# Altium PCB AI_Watch_PCB.PcbDoc (part 1 of 3)
Units mm, origin at the board's own origin, x right, y up, seen from the top; angles counter-clockwise.
Board outline 25 x 31 mm, 4 copper layers (Top Layer, Ground, Power, Bottom Layer), stack 1.586 mm thick; 87 components, 63 nets, 302 pads, 164 vias.
Unrouted connection lines stored in the file: 13.
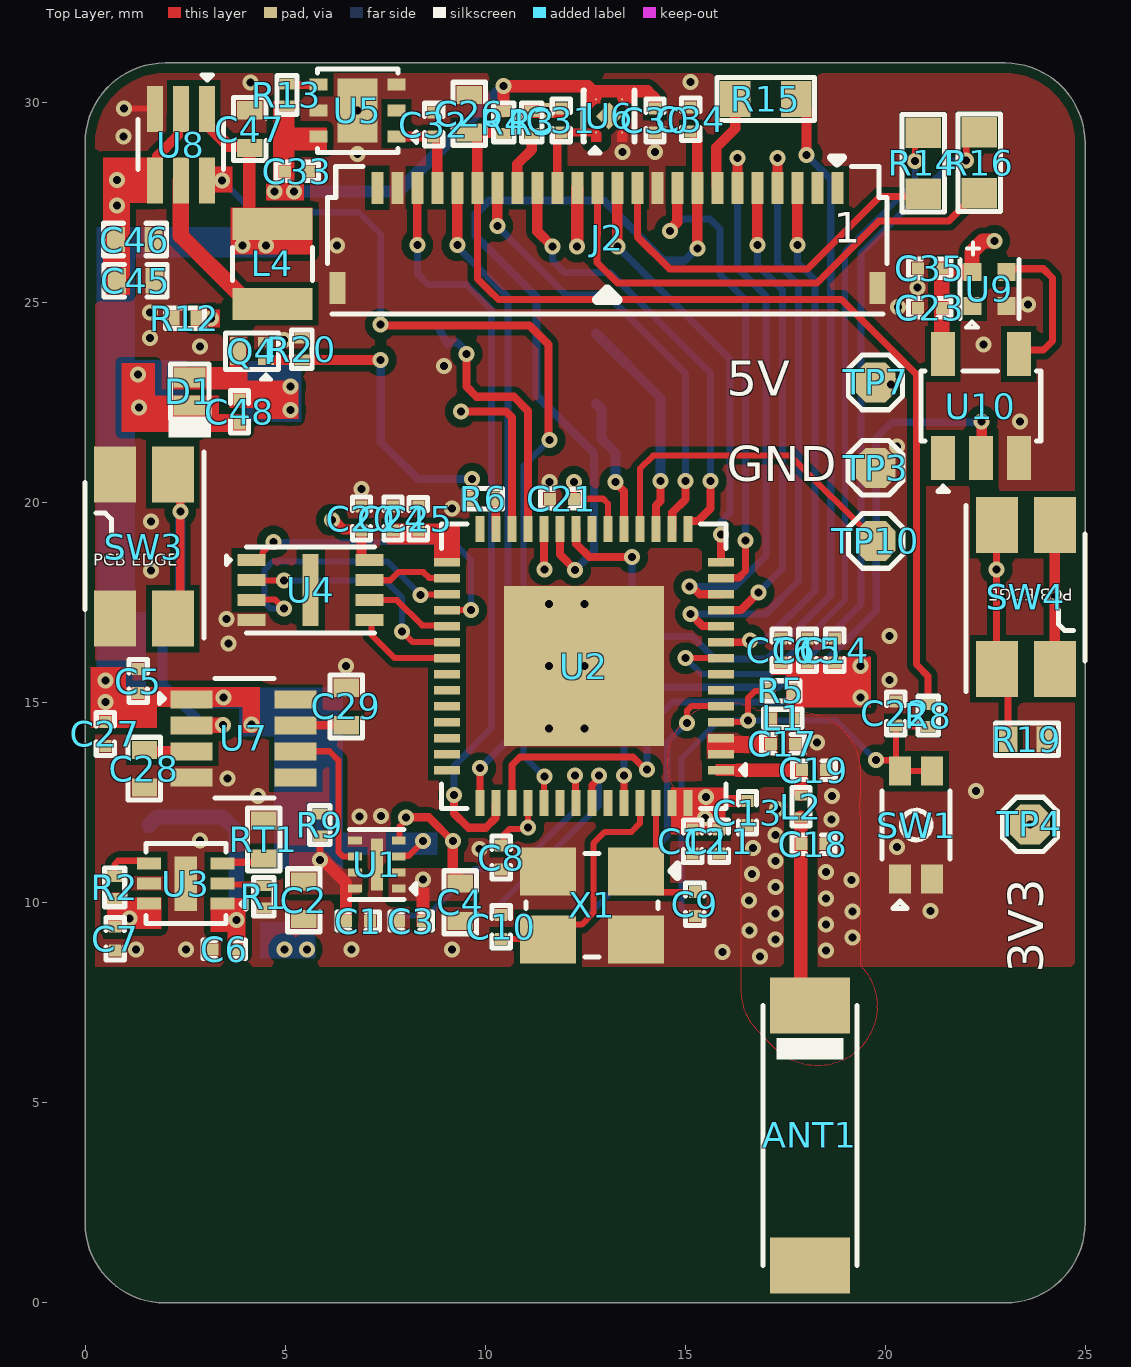
[diagram p0: Top Layer view]
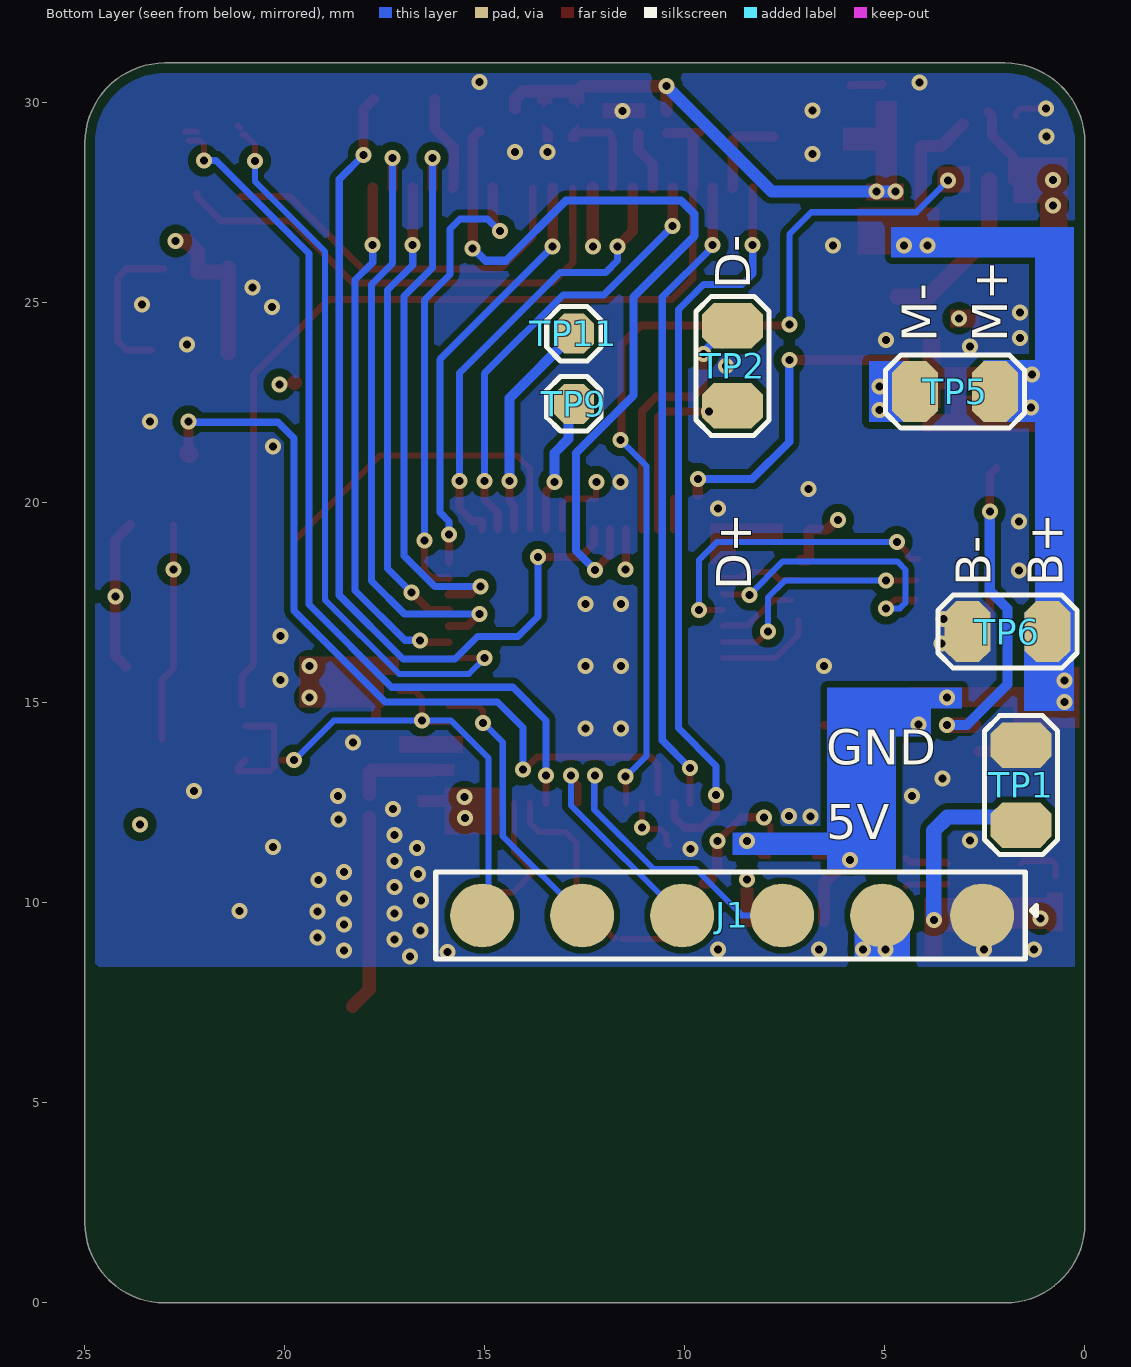
[diagram p1: Bottom Layer view, seen from below]
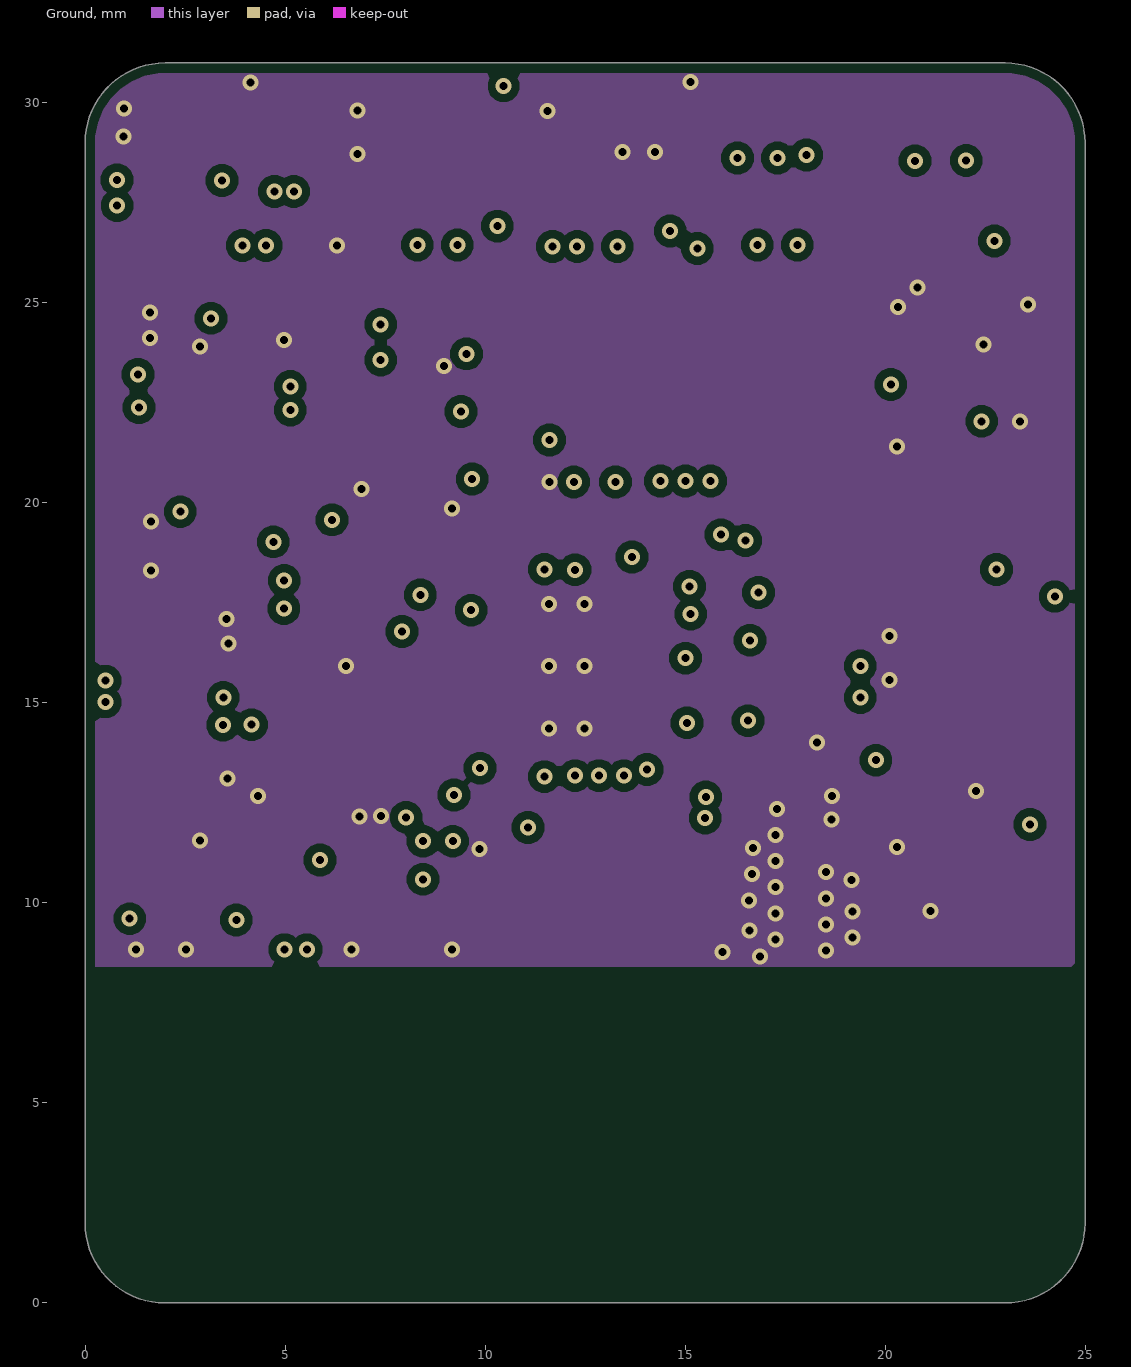
[diagram p2: Ground]
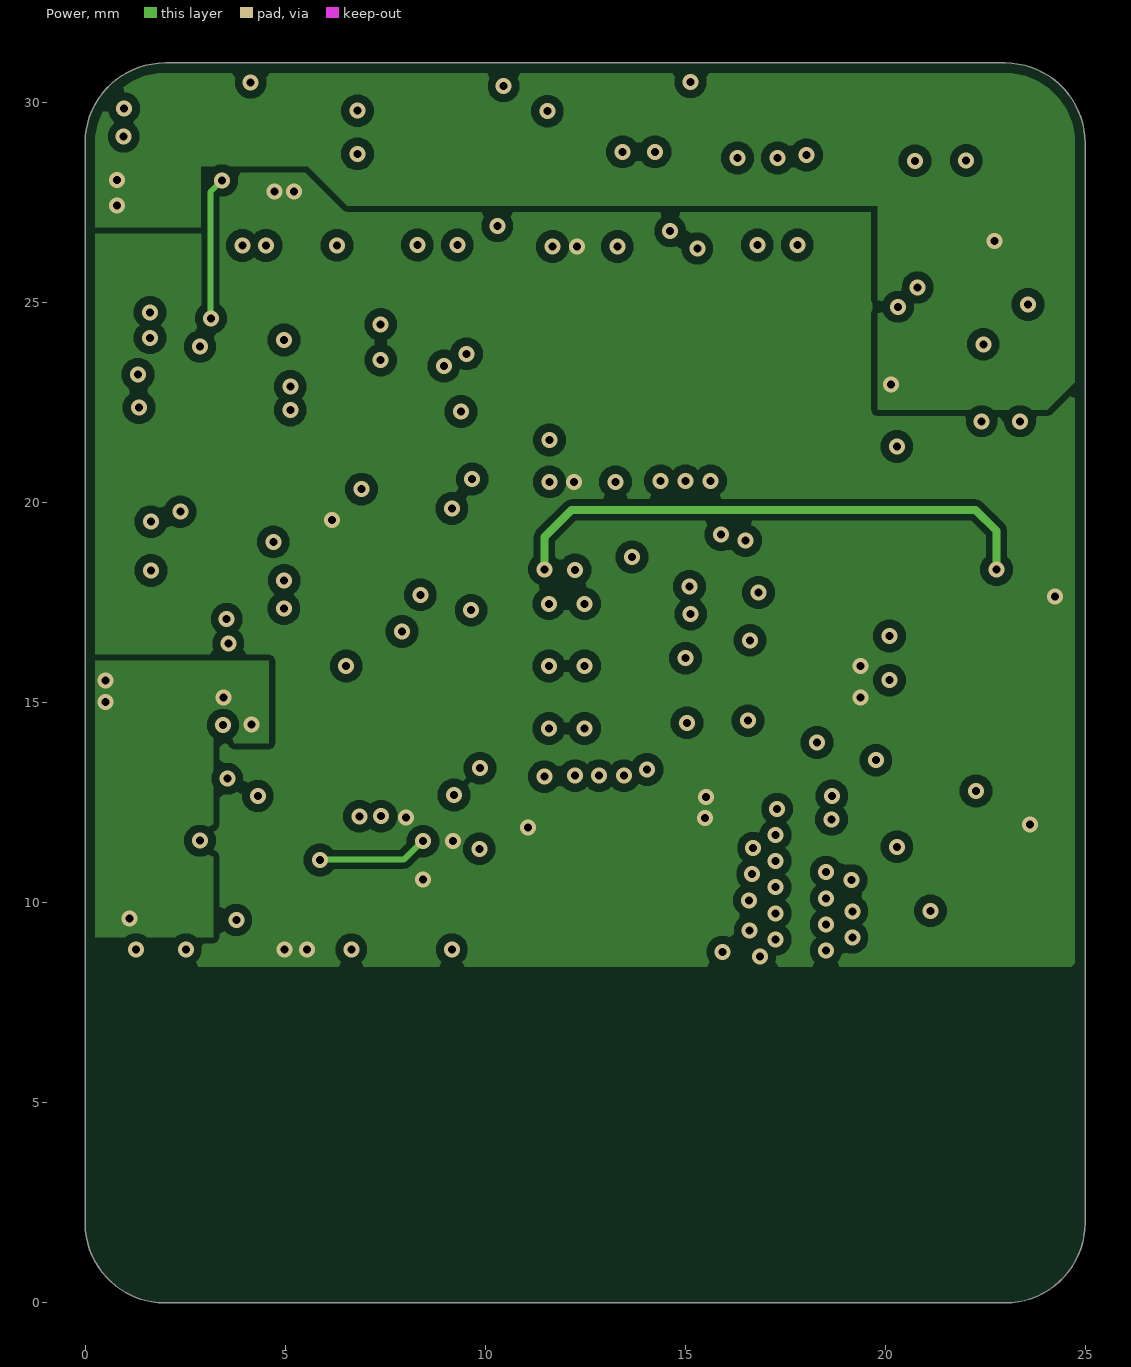
[diagram p3: Power]
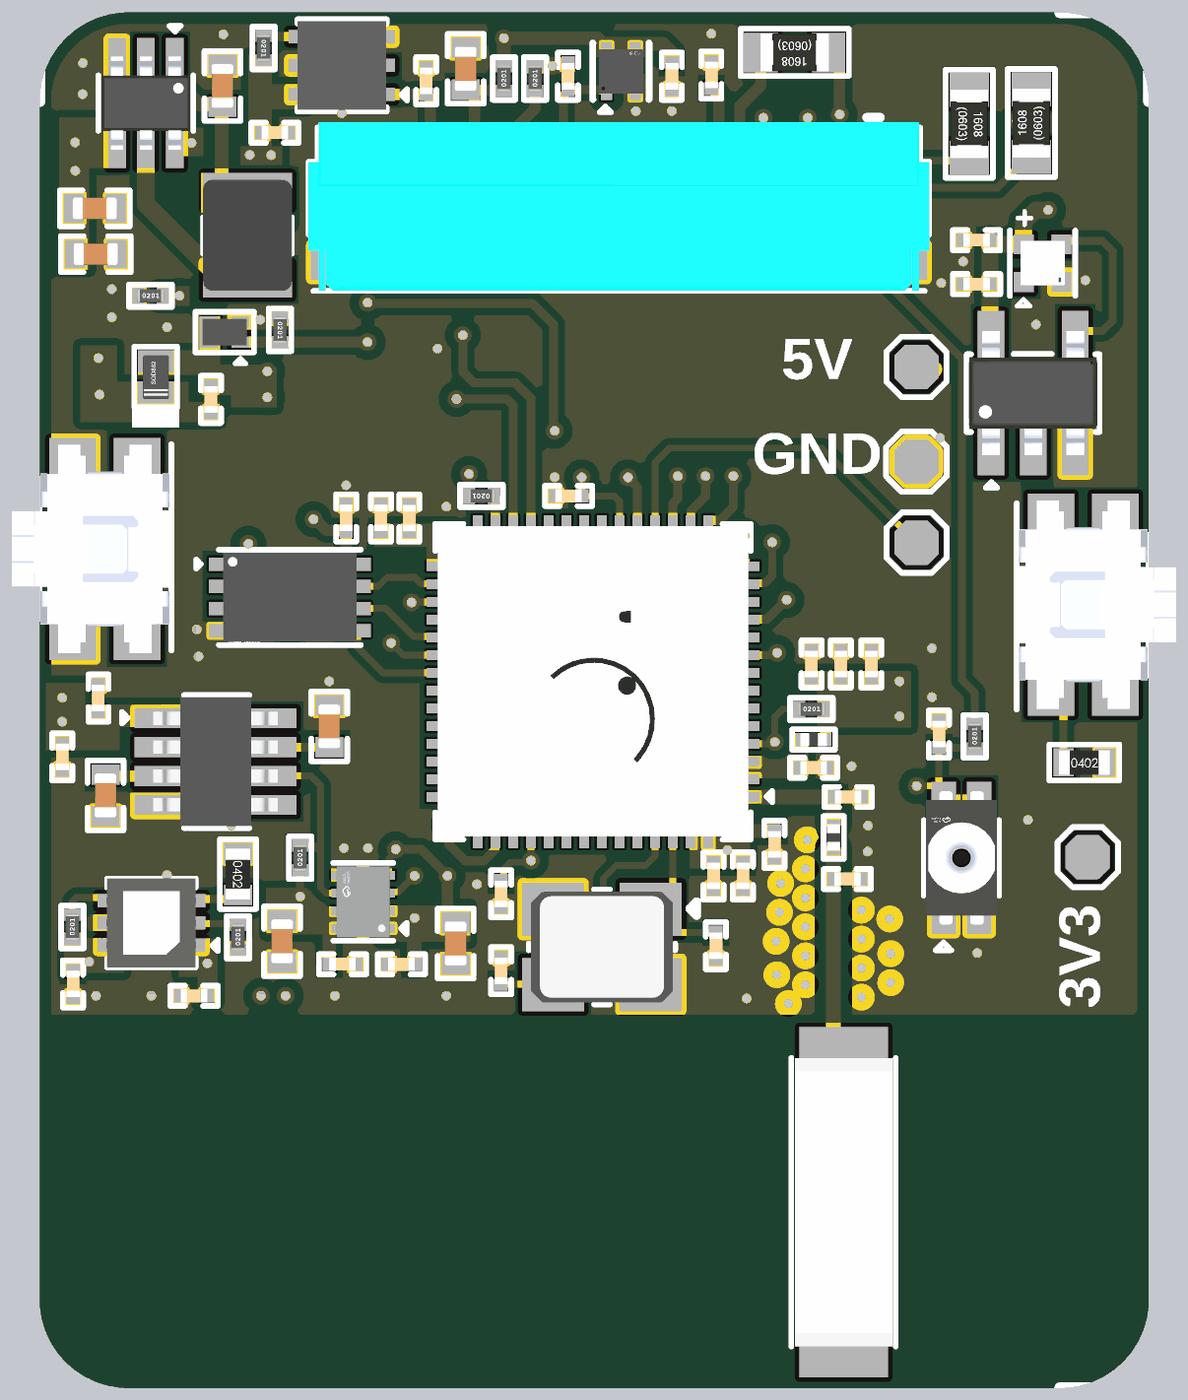
[diagram p5: 3D render of the assembled board from above, using the file's embedded part models]

## Layer stack, top to bottom
Top Solder: solder mask 0.0102, Solder Resist, Dk 3.8
Top Layer: signal copper 0.035
Dielectric 2: prepreg 0.2104, PP-006, Dk 4.4
Ground: signal copper 0.0152
Dielectric 1: core 1.065, FR-4, Dk 4.6
Power: signal copper 0.0152
Dielectric 3: prepreg 0.2104, PP-006, Dk 4.4
Bottom Layer: signal copper 0.035
Bottom Solder: solder mask 0.0102, Solder Resist, Dk 3.8

## Board outline
2,0 cw(c2,2) 0,2 0,29 cw(c2,29) 2,31 23,31 cw(c23,29) 25,29 25,2 cw(c23,2) 23,0

## Design rules (kind name [scope] priority, off if disabled: settings)
BoardOutlineClearance [All] p1: gap=0 ignorepadtopadclearanceinfootprint=FALSE except(0.254: Poly-OutlineEdge)
Clearance [All] p1: gap=0.254 ignorepadtopadclearanceinfootprint=TRUE except(0: Arc-Hole Track-Hole SMDPad-Hole THPad-Hole Via-Hole Fill-Hole Poly-Hole Region-Hole Text-Hole; 0.127: Arc-SMDPad Arc-Text Track-SMDPad SMDPad-SMDPad SMDPad-Fill Fill-Fill Text-Text; 0.152: Arc-Arc Arc-Track Arc-Poly Track-Track Track-Poly SMDPad-Poly Fill-Poly Poly-Poly; 0.178: Arc-Via Arc-Region Track-Via SMDPad-Via SMDPad-Region THPad-Via THPad-Poly Via-Via Via-Fill; 0.203: Via-Poly)
MinimumSolderMaskSliver [All] p1: minsoldermaskwidth=0.025
PolygonConnect [All] p1: thpad.connectstyle=Relief thpad.reliefconductorwidth=0.254 thpad.reliefentries=4 thpad.polygonreliefangle="90 Angle" thpad.airgapwidth=0.254 smdpad.connectstyle=Direct smdpad.reliefconductorwidth=0.254 smdpad.reliefentries=4 smdpad.polygonreliefangle="90 Angle" smdpad.airgapwidth=0.254 via.connectstyle=Direct via.reliefconductorwidth=0.254 via.reliefentries=4 via.polygonreliefangle="90 Angle" via.airgapwidth=0.254
RoutingVias [All] p1: holewidth=0.2 width=0.4 viastyle="Through Hole" minholewidth=0.2 minwidth=0.4 maxholewidth=0.2 maxwidth=0.4
SilkToSilkClearance [All] p1: silktosilkclearance=0
SilkToSolderMaskClearance [IsPad] p1: minsilkscreentomaskgap=0.003 clearancetoexposedcopper=TRUE
SolderMaskExpansion [All] p1: expansion=0.102 istentingtop=FALSE
Width RF [InNetClass('RF')] p1: maxlimit=0.33 minlimit=0.267 preferedwidth=0.33 toplayer_minwidth=0.33 bottomlayer_minwidth=0.33 impedanceprofiledriven=TRUE impedanceprofileid={CFCCCAA3-0583-4BB1-BB14-370E79FB1EA7} impedanceprofilevalue=50.000000 minimp=50.000000 maximp=50.000000 favimp=50.000000
Width [All] p2: maxlimit=0.762 minlimit=0.127 preferedwidth=0.254 minimp=50.000000 maximp=50.000000 favimp=50.000000
27 further rules are at their usual default settings.

## Classes and differential pairs
net class RF: LNA_IN NetANT1_1
component class Power_Sheet: C1 C2 C3 C4 C5 C6 C7 C27 C28 C29 C45 C46 C47 L4 R1 R2 R9 R12 RT1 SW3 TP1 TP6 U1 U3 U7 U8
component class Controller_Sheet: ANT1 C8 C9 C10 C11 C12 C13 C14 C15 C16 C17 C18 C19 C20 C21 C22 C23 C24 C25 C35 C48 D1 J1 L1 L2 Q4 R5 R6 R14 R15 R16 R19 R20 SW1 SW4 TP2 TP3 TP4 TP5 TP7 TP9 TP10 TP11 U2 U4 U9 U10 X1
component class Camera_Sheet: C26 C30 C31 C32 C33 C34 J2 R3 R4 R8 R13 U5 U6

## Components (designator, comment, footprint, x,y, rotation, side; value= is the part's Value field where it differs from the comment)
ANT1 "AN6520-245" AN6520-245 18.12,4.187 r270 top
C1 "2.2uF" CAP-0201 6.826,9.549 r180 top
C2 "10uF" Cap-0402 5.465,10.069 r90 top
C3 "2.2uF" CAP-0201 8.153,9.549 r0 top
C4 "10uF" Cap-0402 9.376,10.018 r90 top
C5 "0.1uF" CAP-0201 1.325,15.549 r270 top
C6 "1uF" CAP-0201 3.479,8.839 r0 top
C7 "2.2uF" CAP-0201 0.751,9.106 r90 top
C8 "0.1uF" CAP-0201 10.401,11.136 r90 top
C9 "10pF" CAP-0201 15.242,9.969 r90 top
C10 "10pF" CAP-0201 10.401,9.403 r90 top
C11 "2.2uF" CAP-0201 15.85,11.541 r90 top
C12 "0.1uF" CAP-0201 15.189,11.541 r90 top
C13 "10nF" CAP-0201 16.561,12.252 r90 top
C14 "2.2uF" CAP-0201 18.745,16.316 r270 top
C15 "2.2uF" CAP-0201 18.059,16.316 r270 top
C16 "0.1uF" CAP-0201 17.399,16.316 r270 top
C17 "0.1uF" CAP-0201 17.445,13.979 r180 top
C18 "2.7pF" CAP-0201 18.207,11.47 r180 top
C19 "4.7pF" CAP-0201 18.221,13.319 r180 top
C20 "0.1uF" CAP-0201 6.909,19.61 r270 top
C21 "0.1uF" CAP-0201 11.921,20.105 r0 top
C22 "0.1uF" CAP-0201 20.269,14.737 r90 top
C23 "2.2uF" CAP-0201 21.118,24.879 r0 top
C24 "0.1uF" CAP-0201 7.696,19.61 r270 top
C25 "1uF" CAP-0201 8.331,19.606 r90 top
C26 "15pF" Cap-0402 9.601,29.731 r270 top
C27 "2.2uF" CAP-0201 0.508,14.224 r90 top
C28 "680nF" Cap-0402 1.484,13.356 r90 top
C29 "680nF" Cap-0402 6.528,14.913 r270 top
C30 "0.1uF" CAP-0201 14.249,29.563 r90 top
C31 "0.1uF" CAP-0201 11.908,29.563 r270 top
C32 "0.1uF" CAP-0201 8.712,29.459 r270 top
C33 "0.1uF" CAP-0201 5.302,28.289 r180 top
C34 "15pF" Cap-0201 15.138,29.59 r90 top
C35 "0.1uF" CAP-0201 21.117,25.867 r180 top
C45 "4.7uF" Cap-0402 1.265,25.554 r180 top
C46 "4.7uF" Cap-0402 1.243,26.586 r0 top
C47 "10uF" Cap-0402 4.121,29.346 r270 top
C48 "0.1uF" CAP-0201 3.861,22.281 r270 top
D1 "LMBR4010BST5G" SOD-882 2.616,22.784 r270 top
J1 "POGO Connector 6 Pin" "POGO 6 Pin" 7.569,9.687 r0 bottom
J2 "FH34SRJ-24S-0.5SH(50)" FH34SRJ-24S-0.5SH(50) 13.056,26.629 r0 top
L1 "2.2nH" IND-0201 17.445,14.614 r180 top
L2 "1.6nH" IND-0201 17.897,12.406 r90 top
L4 "4.7uH" SLO252012F4R7MTT 4.684,25.979 r270 top
Q4 "RV2C010UNT2L" DFN1006-3 4.171,23.796 r90 top
R1 "4.7K" Res-0201 4.47,10.156 r90 top
R2 "10K" Res-0201 0.737,10.389 r90 top
R3 "10K" Res-0201 11.167,29.512 r90 top
R4 "0R" Res-0201 10.464,29.512 r90 top
R5 "10K" Res-0201 17.394,15.3 r0 top
R6 "100R" Res-0201 9.957,20.105 r180 top
R8 "0R" Res-0201 21.076,14.686 r90 top
R9 "10K" Res-0201 5.871,11.95 r90 top
R12 "10K" Res-0201 2.497,24.617 r0 top
R13 "10K" Res-0201 5.048,30.2 r270 top
R14 "0R" Res-0603 20.952,28.492 r90 top
R15 "0R" Res-0603 17.018,30.098 r0 top
R16 "0R" Res-0603 22.352,28.507 r270 top
R19 "10K" Res-0402 23.546,14.097 r0 top
R20 "10K" Res-0201 5.416,23.846 r270 top
RT1 "10K" Res-0402 4.47,11.582 r270 top value=10kR
SW1 "SKTAAAE010" SKTAAAE010 20.777,11.947 r90 top
SW3 "EVQ-P7A01P" EVQP7A01P 1.47,18.907 r270 top
SW4 "EVQ-P7A01P" EVQP7A01P 23.52,17.653 r90 top
TP1 "2 Test Pad" "2 Test Pad" 1.597,13.945 r270 bottom
TP2 "2 Test Pad" "2 Test Pad" 8.81,22.428 r90 bottom
TP3 "TEST POINT 0.5mm Dia" "Test-point - 0.5mm" 19.761,20.879 r0 top
TP4 "TEST POINT 0.5mm Dia" "Test-point - 0.5mm" 23.622,11.963 r0 top
TP5 "2 Test Pad" "2 Test Pad" 4.247,22.785 r180 bottom
TP6 "2 Test Pad" "2 Test Pad" 2.937,16.783 r180 bottom
TP7 "TEST POINT 0.5mm Dia" "Test-point - 0.5mm" 19.761,23.012 r90 top
TP9 "TEST POINT 0.5mm Dia" "Test-point - 0.5mm" 12.776,22.479 r90 bottom
TP10 "TEST POINT 0.5mm Dia" "Test-point - 0.5mm" 19.766,19.05 r90 top
TP11 "TEST POINT 0.5mm Dia" "Test-point - 0.5mm" 12.776,24.232 r90 bottom
U1 "LD56100DPU33R" DFN-8(1.2x1.6) 7.293,10.958 r180 top
U2 "ESP32-S3R8" "56-QFN (7x7)" 12.471,15.919 r180 top
U3 "FAN54120MP420X" DFN-6-EP(2x2) 2.518,10.482 r180 top
U4 "GD25Q16EEIGR" USON-8(2x3) 5.639,17.819 r0 top
U5 "TPS78228DRVR" "6-WSON (2x2)" 6.809,29.806 r180 top
U6 "XC6504A1219R-G" USPQ-4B04(1x1) 13.101,29.676 r90 top
U7 "LTC2950CTS8-2#TRPBF" TSOT-23-8 3.964,14.118 r0 top
U8 "TPS61222DCKR" SC-70-6 2.393,28.957 r270 top
U9 "XL-1010RGBC-WS2812B" XL-1010RGBC-WS2812B 22.606,25.349 r90 top
U10 "SN74LV1T34DBVR" SOT-23-5 22.393,22.424 r90 top
X1 "40MHz" X322540MPB4SI_ 12.675,9.941 r180 top value=40MHZ

## Footprints (in the part's own frame and the unit in brackets; to place one, negate y for a bottom-side part, rotate by r counter-clockwise, add the part's x,y. Pads: shape width x height; smd on the part's side, far side on the other; paste and mask are expansions set on the pad)
"2 Test Pad" [mil]
  oct 45x60 smd: 1(0,0) 2(78.74,0)
  silkscreen extent -29,-36 108,36
"6-WSON (2x2)" [mm] "TPS60150DRVR"
  rect 0.45x0.3 smd: 1(-0.975,0.65) 2(-0.975,0) 3(-0.975,-0.65) 4(0.975,-0.65) 5(0.975,0) 6(0.975,0.65)
  rect 1x1.6 smd: 7(0,0)
  silkscreen extent -1.47,-1.04 1,1.04, body extent -1,-1 1,1, height 0.78
"56-QFN (7x7)" [mm]
  rect 0.65x0.22 smd mask+0.055: 1(-3.425,2.6) 2(-3.425,2.2) 3(-3.425,1.8) 4(-3.425,1.4) 5(-3.425,1) 6(-3.425,0.6) 7(-3.425,0.2) 8(-3.425,-0.2) 9(-3.425,-0.6) 10(-3.425,-1) 11(-3.425,-1.4) 12(-3.425,-1.8) 13(-3.425,-2.2) 14(-3.425,-2.6) 29(3.425,-2.6) 30(3.425,-2.2) 31(3.425,-1.8) 32(3.425,-1.4) 33(3.425,-1) 34(3.425,-0.6) 35(3.425,-0.2) 36(3.425,0.2) 37(3.425,0.6) 38(3.425,1) 39(3.425,1.4) 40(3.425,1.8) 41(3.425,2.2) 42(3.425,2.6)
  rect 0.22x0.65 smd mask+0.055: 15(-2.6,-3.425) 16(-2.2,-3.425) 17(-1.8,-3.425) 18(-1.4,-3.425) 19(-1,-3.425) 20(-0.6,-3.425) 21(-0.2,-3.425) 22(0.2,-3.425) 23(0.6,-3.425) 24(1,-3.425) 25(1.4,-3.425) 26(1.8,-3.425) 27(2.2,-3.425) 28(2.6,-3.425) 43(2.6,3.425) 44(2.2,3.425) 45(1.8,3.425) 46(1.4,3.425) 47(1,3.425) 48(0.6,3.425) 49(0.2,3.425) 50(-0.2,3.425) 51(-0.6,3.425) 52(-1,3.425) 53(-1.4,3.425) 54(-1.8,3.425) 55(-2.2,3.425) 56(-2.6,3.425)
  rect 4x4 smd mask+0.055: 57(0,0)
  silkscreen extent -4.04,-3.56 3.56,3.56, body extent -3.5,-3.51 3.5,3.49, height 0.92
AN6520-245 [mm]
  rect 1.4x2 smd: 1(-3.25,0) 2(3.25,0)
  silkscreen extent -3.25,-1.18 3.25,1.18, body extent -3.25,-1.1 3.25,1.1, height 1
CAP-0201 [mm]
  rect 0.3x0.3 smd mask+0.055: 1(-0.3,0) 2(0.3,0)
  silkscreen extent -0.53,-0.23 0.53,0.23, body extent -0.3,-0.15 0.3,0.15, height 0.28
Cap-0201 [mm]
  rect 0.3x0.3 smd mask+0.055: 1(-0.3,0) 2(0.3,0)
  silkscreen extent -0.53,-0.23 0.53,0.23, body extent -0.3,-0.15 0.3,0.15, height 0.28
Cap-0402 [mil]
  rect 18x25 smd mask+2.36: 1(-18.5,0) 2(18.5,0)
  silkscreen extent -31,-16 31,16, body extent -20,-10 20,10, height 19
DFN1006-3 [mm]
  rect 0.25x0.4 smd: 1(-0.225,-0.35) 2(0.225,-0.35)
  rect 0.7x0.4 smd: 3(0,0.35)
  silkscreen extent -0.71,-0.66 0.46,0.66, body extent -0.3,-0.5 0.3,0.5, height 0.53
DFN-6-EP(2x2) [mm]
  rect 0.6x0.3 smd: 1(-0.917,0.5) 2(-0.917,0) 3(-0.917,-0.5) 4(0.918,-0.5) 5(0.918,0) 6(0.918,0.5)
  rect 0.56x1.37 smd: 7(0,0)
  silkscreen extent -1.5,-1 1,1, body extent -1.01,-1 1.01,1, height 0.76
DFN-8(1.2x1.6) [mm]
  rect 0.345x0.2 smd paste+0 mask+0.051: 1(-0.547,0.6) 2(-0.547,0.2) 3(-0.547,-0.2) 4(-0.547,-0.6) 5(0.547,-0.6) 6(0.547,-0.2) 7(0.547,0.2) 8(0.547,0.6)
  rect 0.3x1.3 smd paste+0 mask+0.051: 9(0,0)
  silkscreen extent -0.98,-0.88 0.68,0.88, body extent -0.61,-0.81 0.61,0.81, height 0.4
EVQP7A01P [mm]
  rect 1.4x1.05 smd: 1(-1.8,0.725) 1(1.8,0.725) 2(-1.8,-0.725) 2(1.8,-0.725)
  silkscreen extent -2.36,-1.47 2.29,1.5, body extent -2.35,-2.1 2.35,1.45, height 1.35
FH34SRJ-24S-0.5SH(50) [mm]
  rect 0.3x0.8 smd: 1(5.75,1.25) 2(5.25,1.25) 3(4.75,1.25) 4(4.25,1.25) 5(3.75,1.25) 6(3.25,1.25) 7(2.75,1.25) 8(2.25,1.25) 9(1.75,1.25) 10(1.25,1.25) 11(0.75,1.25) 12(0.25,1.25) 13(-0.25,1.25) 14(-0.75,1.25) 15(-1.25,1.25) 16(-1.75,1.25) 17(-2.25,1.25) 18(-2.75,1.25) 19(-3.25,1.25) 20(-3.75,1.25) 21(-4.25,1.25) 22(-4.75,1.25) 23(-5.25,1.25) 24(-5.75,1.25)
  rect 0.4x0.8 smd: MP1(-6.75,-1.25) MP2(6.75,-1.25)
  silkscreen extent -6.99,-1.91 6.99,2.01, body extent -7,-1.9 7,1.9, height 1
IND-0201 [mm]
  rect 0.25x0.3 smd mask+0.055: 1(-0.275,0) 2(0.275,0)
  silkscreen extent -0.48,-0.23 0.48,0.23, body extent -0.3,-0.15 0.3,0.15, height 0.15
"POGO 6 Pin" [mm]
  round 1.6 smd: 1(-5,0) 2(-2.5,0) 3(0,0) 4(2.5,0) 5(5,0) 6(7.5,0)
  silkscreen extent -6.36,-1.09 8.66,1.09
Res-0201 [mm]
  rect 0.27x0.37 smd mask+0.055: 1(-0.275,0) 2(0.275,0)
  silkscreen extent -0.48,-0.25 0.48,0.25, body extent -0.3,-0.15 0.3,0.15, height 0.29
Res-0402 [mil]
  rect 18x25 smd mask+2.17: 1(-18.5,0) 2(18.5,0)
  silkscreen extent -32,-17 32,16, body extent -23,-11 23,11, height 16
Res-0603 [mil]
  rect 30x35 smd: 1(-30,0) 2(30,0)
  silkscreen extent -48,-21 48,21, body extent -31,-17 31,17, height 18
SC-70-6 [mm]
  rect 1.15x0.4 smd: 1(-0.89,0.65) 2(-0.89,0) 3(-0.89,-0.65) 4(0.89,-0.65) 5(0.89,0) 6(0.89,0.65)
  silkscreen extent -1.74,-1.07 0.63,1.07, body extent -1.05,-1 1.05,1, height 1.1
SKTAAAE010 [mm]
  rect 0.72x0.55 smd: 1(-1.35,0.4) 2(1.35,0.4) 3(-1.35,-0.4) 4(1.35,-0.4)
  silkscreen extent -2.08,-0.85 0.85,0.85, body extent -1.5,-0.8 1.5,0.8, height 0.54
SLO252012F4R7MTT [mm]
  rect 0.8x2 smd: 1(-1,0) 2(1,0)
  silkscreen extent -0.41,-1 0.42,1, body extent -1.25,-1 1.25,1, height 1.2
SOD-882 [mm]
  rect 0.5x0.8 smd mask+0.055: 1(-0.35,0) 2(0.35,0)
  silkscreen extent -0.69,-0.53 1.14,0.53, body extent -0.49,-0.29 0.49,0.29, height 0.48
SOT-23-5 [mm]
  rect 1.1x0.6 smd: 1(-1.3,0.95) 2(-1.3,0) 3(-1.3,-0.95) 4(1.3,-0.95) 5(1.3,0.95)
  silkscreen extent -2.13,-1.5 0.88,1.5, body extent -1.4,-1.45 1.4,1.45, height 1.45
"Test-point - 0.5mm" [mm]
  oct 1x1 smd: 1(0,0)
  silkscreen extent -0.68,-0.68 0.68,0.68
TSOT-23-8 [mm]
  rect 1.05x0.45 smd: 1(-1.3,0.975) 2(-1.3,0.325) 3(-1.3,-0.325) 4(-1.3,-0.975) 5(1.3,-0.975) 6(1.3,-0.325) 7(1.3,0.325) 8(1.3,0.975)
  silkscreen extent -2.11,-1.5 0.76,1.5, body extent -1.4,-1.45 1.4,1.45, height 1
USON-8(2x3) [mm]
  rect 0.7x0.3 smd mask+0.055: 1(-1.473,0.75) 2(-1.473,0.25) 3(-1.473,-0.25) 4(-1.473,-0.75) 5(1.473,-0.75) 6(1.473,-0.25) 7(1.473,0.25) 8(1.473,0.75)
  rect 0.4x1.8 smd: 9(0,0)
  silkscreen extent -2.11,-1.07 1.6,1.07, body extent -1.5,-1 1.5,1, height 0.47
USPQ-4B04(1x1) [mm]
  round 0.05 smd: 1(-0.415,0.325) 2(-0.415,-0.325) 3(0.415,-0.325) 4(0.415,0.325)
  rect 0.48x0.47 smd rot 135: 5(0,0)
  Top Layer region: 0.415,0.2 0.18,0.45 0.65,0.45 0.65,0.2 0.415,0.2
  Top Layer region: -0.415,-0.2 -0.18,-0.45 -0.65,-0.45 -0.65,-0.2 -0.415,-0.2
  Top Layer region: 0.18,-0.45 0.415,-0.2 0.65,-0.2 0.65,-0.45 0.18,-0.45
  Top Layer region: -0.18,0.45 -0.415,0.2 -0.65,0.2 -0.65,0.45 -0.18,0.45
  silkscreen extent -0.92,-0.64 0.64,0.64, body extent -0.51,-0.5 0.51,0.5, height 0.61
X322540MPB4SI_ [mm]
  rect 1.4x1.2 smd: 1(-1.1,-0.85) 2(1.1,-0.85) 3(1.1,0.85) 4(-1.1,0.85)
  silkscreen extent -2.13,-1.3 1.65,1.3, body extent -1.6,-1.25 1.6,1.25, height 0.8
XL-1010RGBC-WS2812B [mm]
  rect 0.45x0.45 smd: 1(-0.425,0.425) 2(0.425,0.425) 3(-0.425,-0.425) 4(0.425,-0.425)
  silkscreen extent -0.97,-0.74 1.17,0.74, body extent -0.5,-0.5 0.5,0.5, height 0.81

## Part data
ANT1: "SMD Antennas ROHS", LCSC Part Number=C239238, Manufacturer="Rainsun microwave Tech", ComponentLink1Description=LCSC, ComponentLink1URL=https://www.lcsc.com/product-detail/Antennas_Rainsun-microwave-Tech-AN6520-245_C239238.html, Manufacturer Part Number=AN6520-245
C1 C3 C7 C11 C14 C15 C23 C27: library part CC0201MRX5R6BB225, "CAP CER 2.2UF 10V X5R 0201", Case/Package=0201, LCSC Part Number=C2186869, Manufacturer=Yageo, Max Operating Temperature=85°C, Min Operating Temperature=-55°C, Supplier Part Number=603-CC0201MRX56BB225, Tolerance=20%, Voltage Rating=10V, Category="Ceramic Capacitors", ComponentLink1Description=https://www.yageo.com/upload/media/product/productsearch/datasheet/mlcc/UPY-GPHC_X5R_4V-to-50V_26.pdf?src-supplier=Digi-Key, ComponentLink1URL=https://www.yageo.com/upload/media/product/productsearch/datasheet/mlcc/UPY-GPHC_X5R_4V-to-50V_26.pdf?src-supplier=Digi-Key, Item Type=Capacitor, Manufacturer Part Number=CC0201MRX5R6BB225, Mounting Technology="Surface Mount", Packaging="Tape and Reel", Pricing="1=0.43, 10=0.294, 50=0.294, 100=0.176, 1000=0.112, 10000=0.091 (USD)", RoHS=Yes, RoHS Compliant=Yes, Series=CC, Stock=25553, Supplier=Mouser
C2 C4 C47: library part CC0402MRX5R6BB106, "CAP CER 10UF 10V X5R 0402", Case Code (Imperial)=0402, Case Code (Metric)=1005, LCSC Part Number=C962143, Manufacturer=Yageo, Max Operating Temperature=85°C, Min Operating Temperature=-55°C, Supplier Part Number 1=6097631, Tolerance=20%, Voltage Rating=10V, Capacitance=10uF, Case/Package=0402, Category="Ceramic Capacitors", ComponentLink1Description=http://www.yageo.com/documents/recent/UPY-GPHC_X5R_4V-to-50V_25.pdf?src-supplier=Digi-Key, ComponentLink1URL=http://www.yageo.com/documents/recent/UPY-GPHC_X5R_4V-to-50V_25.pdf?src-supplier=Digi-Key, Item Type=Capacitor, Manufacturer Part Number=CC0402MRX5R6BB106, Mount="Surface Mount", Packaging="Tape and Reel", Pricing 1="10000=0.02650, 20000=0.02590, 30000=0.02550, 40000=0.02530, 50000=0.02450 (USD)", RoHS=Yes, RoHS Compliant=Yes, Stock 1=80000, Supplier 1="Future Electronics"
C5 C8 C12 C16 C17 C20 C21 C22 C24 C30 C31 C32 C33 C35 C48: library part GRM033C81E104KE14D, "CAP CER 0.1UF 25V X6S 0201", Capacitance=100nF, Case Code (Imperial)=0201, Case Code (Metric)=0603, Dielectric=X6S, Manufacturer=Murata, Max Operating Temperature=105°C, Min Operating Temperature=-55°C, Package Quantity=15000, Supplier Part Number 1=490-10403-1-ND, Tolerance=10%, Voltage Rating=25V, Case/Package=0201, Category="Ceramic Capacitors", ComponentLink1Description=http://www.mouser.com/ds/2/281/c02e-2905.pdf?src-supplier=Mouser, ComponentLink1URL=http://www.mouser.com/ds/2/281/c02e-2905.pdf?src-supplier=Mouser, ComponentLink2Description=http://www.farnell.com/datasheets/2722733.pdf?src-supplier=Farnell, ComponentLink2URL=http://www.farnell.com/datasheets/2722733.pdf?src-supplier=Farnell, ComponentLink3Description=http://search.murata.co.jp/Ceramy/image/img/A01X/G101/ENG/GRM033C81E104KE14-01.pdf?src-supplier=Digi-Key, ComponentLink3URL=http://search.murata.co.jp/Ceramy/image/img/A01X/G101/ENG/GRM033C81E104KE14-01.pdf?src-supplier=Digi-Key, Height=0.3mm, Length=0.024inch, Manufacturer Part Number=GRM033C81E104KE14D, Mount="Surface Mount", Packaging="Tape and Reel", Pricing 1="1=0.10000, 10=0.05100, 50=0.02780, 100=0.02260, 500=0.01616, 1000=0.01270, 2500=0.01155, 5000=0.01063 (USD)", RoHS=Yes, RoHS Compliant=Yes, Stock 1=91, Supplier 1=Digi-Key, Termination=SMD/SMT, Thickness=0.013inch, Voltage Rating (DC)=25V, Weight=1.2E-05oz, Width=0.3mm
C6 C25: library part CC0201MRX5R7BB105, "CAP CER 1UF 16V X5R 0201", LCSC Part Number=C5182464, Manufacturer=Yageo, Supplier Part Number=13-CC0201MRX5R7BB105TR-ND, Category="Ceramic Capacitors", Item Type=Capacitor, Manufacturer Part Number=CC0201MRX5R7BB105, RoHS=Yes, Supplier=Digi-Key
C9 C10: library part CGA1A2C0G1E100D030BA, "CAP CER 10PF 25V C0G 0201", Case Code (Imperial)=0201, Case Code (Metric)=0603, Dielectric=C0G, LCSC Part Number=C2168728, Manufacturer=TDK, Max Operating Temperature=125°C, Min Operating Temperature=-55°C, Package Quantity=1, Ratings=AEC-Q200, Resistor Type=Ceramic, Supplier Part Number 1=445-9023-1-ND, Voltage Rating=25V, Capacitance=10pF, Case/Package=0201, Category="Ceramic Capacitors", ComponentLink1Description=https://datasheet.ciiva.com/24220/cga1a2c0g1e100d030ba-271838-24220873.pdf?src-supplier=Mouser, ComponentLink1URL=https://datasheet.ciiva.com/24220/cga1a2c0g1e100d030ba-271838-24220873.pdf?src-supplier=Mouser, Depth=0.3mm, Height=0.3mm, Item Type=Capacitor, Length=0.6mm, Manufacturer Part Number=CGA1A2C0G1E100D030BA, Mount="Surface Mount", Packaging="Tape and Reel", Pricing 1="1=0.11000, 10=0.07900, 50=0.04340, 100=0.03540, 500=0.02530, 1000=0.01987, 2500=0.01807, 5000=0.01662 (USD)", RoHS=Yes, RoHS Compliant=Yes, Series=CGA, Stock 1=28695, Supplier 1=Digi-Key, Termination=SMD/SMT, Thickness=0.013inch, Voltage Rating (DC)=25V, Weight=6E-06oz, Width=0.3mm
C13: library part GRM033R71E103KE14D, "CAP CER 10000PF 25V X7R 0201", Case/Package=0201, Dielectric=X7R, LCSC Part Number=C85930, Manufacturer=Murata, Max Operating Temperature=125°C, Min Operating Temperature=-55°C, Tolerance=10%, Voltage Rating=25V, Capacitance=10nF, Category="Ceramic Capacitors", ComponentLink1Description=http://www.farnell.com/datasheets/2867850.pdf?src-supplier=Farnell, ComponentLink1URL=http://www.farnell.com/datasheets/2867850.pdf?src-supplier=Farnell, ComponentLink2Description=http://www.farnell.com/datasheets/2867850.pdf?src-supplier=Element14, ComponentLink2URL=http://www.farnell.com/datasheets/2867850.pdf?src-supplier=Element14, ComponentLink3Description=http://search.murata.co.jp/Ceramy/image/img/A01X/G101/ENG/GRM033R71E103KE14-01.pdf?src-supplier=Digi-Key, ComponentLink3URL=http://search.murata.co.jp/Ceramy/image/img/A01X/G101/ENG/GRM033R71E103KE14-01.pdf?src-supplier=Digi-Key, ComponentLink4Description=https://datasheet.octopart.com/GRM033R71E103KE14D-Murata-datasheet-99353822.pdf?src-supplier=Future+Electronics, ComponentLink4URL=https://datasheet.octopart.com/GRM033R71E103KE14D-Murata-datasheet-99353822.pdf?src-supplier=Future+Electronics, ComponentLink5Description=http://www.farnell.com/datasheets/2867850.pdf?src-supplier=Newark, ComponentLink5URL=http://www.farnell.com/datasheets/2867850.pdf?src-supplier=Newark, ComponentLink6Description=https://datasheet.octopart.com/GRM033R71E103KE14D-Murata-datasheet-165579666.pdf?src-supplier=TME, ComponentLink6URL=https://datasheet.octopart.com/GRM033R71E103KE14D-Murata-datasheet-165579666.pdf?src-supplier=TME, Height=330um, Item Type=Capacitor, Length=600um, Manufacturer Part Number=GRM033R71E103KE14D, Material=4241ConductorMaterial, Mount="Surface Mount", Pricing 1="15000=0.00231 (USD)", RoHS=Yes, RoHS Compliant=Yes, Series=GRM, Stock 1=60000, Supplier 1=Avnet, Supplier Part Number 1=GRM033R71E103KE14D, Thickness=300um, Voltage Rating (DC)=25V, Width=300um
C18: library part CC0201CRNPO9BN2R7, "CAP CER 2.7PF 50V C0G/NPO 0201", Case Code (Imperial)=0201, Case Code (Metric)=0603, Dielectric=C0G, LCSC Part Number=C325439, Manufacturer=Yageo, Max Operating Temperature=125°C, Min Operating Temperature=-55°C, Voltage Rating=50V, Case/Package=0201, Category="Ceramic Capacitors", ComponentLink1Description=https://datasheet.ciiva.com/13208/upy-gp-np0-16v-to-50v-8-13208314.pdf?src-supplier=Mouser, ComponentLink1URL=https://datasheet.ciiva.com/13208/upy-gp-np0-16v-to-50v-8-13208314.pdf?src-supplier=Mouser, Item Type=Capacitor, Length=0.024inch, Manufacturer Part Number=CC0201CRNPO9BN2R7, Mounting Technology="Surface Mount", Packaging="Tape and Reel", Pricing="15000=0.0017 (USD)", RoHS=Yes, RoHS Compliant=Yes, Series=CC, Stock=15000, Supplier=Avnet, Supplier Part Number=CC0201CRNPO9BN2R7, Termination=SMD/SMT, Thickness=0.013inch, Voltage Rating (DC)=50V, Weight=6E-06oz, Width=0.012inch
C19: library part CC0201BRNPO9BN4R7, "CAP CER 4.7PF 50V C0G/NPO 0201", Case/Package=0201, LCSC Part Number=C505471, Manufacturer=Yageo, Max Operating Temperature=125°C, Min Operating Temperature=-55°C, Voltage Rating=50V, Category="Ceramic Capacitors", ComponentLink1Description=https://www.yageo.com/upload/media/product/productsearch/datasheet/mlcc/UPY-GP_NP0_16V-to-50V_18.pdf?src-supplier=Digi-Key, ComponentLink1URL=https://www.yageo.com/upload/media/product/productsearch/datasheet/mlcc/UPY-GP_NP0_16V-to-50V_18.pdf?src-supplier=Digi-Key, ComponentLink2Description=http://www.yageo.com/documents/recent/UPY-GP_NP0_16V-to-50V_16.pdf?src-supplier=Digi-Key, ComponentLink2URL=http://www.yageo.com/documents/recent/UPY-GP_NP0_16V-to-50V_16.pdf?src-supplier=Digi-Key, Item Type=Capacitor, Length=0.024inch, Manufacturer Part Number=CC0201BRNPO9BN4R7, Mounting Technology="Surface Mount", Packaging="Tape and Reel", Pricing="15000=0.0023 (USD)", RoHS=Yes, RoHS Compliant=Yes, Series=CC, Stock=210000, Supplier="Arrow Electronics", Supplier Part Number=CC0201BRNPO9BN4R7, Thickness=0.013inch, Width=0.012inch
C26: library part CQ0402GRNPO9BN150, "CAP CER 15PF 50V C0G/NPO 0402", Case Code (Imperial)=0402, Case Code (Metric)=1005, Dielectric=C0G, LCSC Part Number=C577406, Manufacturer=Yageo, Max Operating Temperature=125°C, Min Operating Temperature=-55°C, Package Quantity=10000, Tolerance=2%, Voltage Rating=50V, Case/Package=0402, ComponentLink1Description=http://www.mouser.com/ds/2/447/UPY-High%20Q_NP0_16V-to-250V_11-533944.pdf?src-supplier=Mouser, ComponentLink1URL=http://www.mouser.com/ds/2/447/UPY-High%20Q_NP0_16V-to-250V_11-533944.pdf?src-supplier=Mouser, ComponentLink2Description=http://www.yageo.com/documents/recent/UPY-High%20Q_NP0_16V-to-250V_13.pdf?src-supplier=Digikey, ComponentLink2URL=http://www.yageo.com/documents/recent/UPY-High%20Q_NP0_16V-to-250V_13.pdf?src-supplier=Digikey, Item Type=Capacitors, Manufacturer Part Number=CQ0402GRNPO9BN150, Mounting Technology="Surface Mount", Packaging="Tape and Reel", Pricing="10000=0.04366 (USD)", RoHS=Yes, Series=CQ, Supplier=Digikey, Voltage Rating (DC)=50V, Weight=2.3E-05oz
C28 C29: library part CC0402KRX5R6BB684, "CAP CER 0.68UF 10V X5R 0402", LCSC Part Number=C113784, Manufacturer=Yageo, Temperature Coefficient=30ppm/°C, ComponentLink1Description=http://www.yageo.com/exep/pages/download/literatures/ProductSelectionGuide%202014_Final_2.pdf?src-supplier=Digikey, ComponentLink1URL=http://www.yageo.com/exep/pages/download/literatures/ProductSelectionGuide%202014_Final_2.pdf?src-supplier=Digikey, ComponentLink2Description=http://www.yageo.com/documents/recent/UPY-GPHC_X5R_4V-to-50V_25.pdf?src-supplier=Digikey, ComponentLink2URL=http://www.yageo.com/documents/recent/UPY-GPHC_X5R_4V-to-50V_25.pdf?src-supplier=Digikey, ComponentLink3Description=https://www.yageo.com/upload/media/product/productsearch/datasheet/mlcc/UPY-GPHC_X5R_4V-to-50V_26.pdf?src-supplier=Digikey, ComponentLink3URL=https://www.yageo.com/upload/media/product/productsearch/datasheet/mlcc/UPY-GPHC_X5R_4V-to-50V_26.pdf?src-supplier=Digikey, ComponentLink4Description=https://datasheet.octopart.com/CC0402KRX5R6BB684-Yageo-datasheet-86397281.pdf?src-supplier=Future+Electronics, ComponentLink4URL=https://datasheet.octopart.com/CC0402KRX5R6BB684-Yageo-datasheet-86397281.pdf?src-supplier=Future+Electronics, Height=550um, Item Type=Capacitor, Manufacturer Part Number=CC0402KRX5R6BB684, Material=4241ConductorMaterial, Pricing="1=0.12, 10=0.079, 50=0.0474, 100=0.0372, 500=0.0275, 1000=0.02277, 2500=0.0212, 5000=0.01939 (USD)", RoHS=Yes, Stock=42168, Supplier=Digikey
C34: library part CC0201JRNPO9BN150, "CAP CER 15PF 50V C0G/NPO 0201", LCSC Part Number=C277480, Manufacturer=Yageo, Supplier Part Number=2580314, Category="Ceramic Capacitors", ComponentLink1Description=https://datasheet.ciiva.com/176/mlccorderingcode-176501.pdf?src-supplier=Digi-Key, ComponentLink1URL=https://datasheet.ciiva.com/176/mlccorderingcode-176501.pdf?src-supplier=Digi-Key, ComponentLink2Description=https://datasheet.ciiva.com/176/mlccorderingcode-176502.pdf?src-supplier=Digi-Key, ComponentLink2URL=https://datasheet.ciiva.com/176/mlccorderingcode-176502.pdf?src-supplier=Digi-Key, ComponentLink3Description=https://datasheet.ciiva.com/176/mlccorderingcode-176503.pdf?src-supplier=Digi-Key, ComponentLink3URL=https://datasheet.ciiva.com/176/mlccorderingcode-176503.pdf?src-supplier=Digi-Key, ComponentLink4Description=https://datasheet.ciiva.com/17205/upy-gp-np0-16v-to-50v-8-17205625.pdf?src-supplier=Future+Electronics, ComponentLink4URL=https://datasheet.ciiva.com/17205/upy-gp-np0-16v-to-50v-8-17205625.pdf?src-supplier=Future+Electronics, Item Type=Capacitor, Manufacturer Part Number=CC0201JRNPO9BN150, Pricing="15000=0.0012, 60000=0.0011, 225000=0.0011, 600000=0.001, 1500000=0.001 (USD)", RoHS=Yes, Stock=585000, Supplier="Future Electronics"
C45 C46: library part CL05A475MO5NUNC, "CAP CER 4.7UF 16V X5R 0402", Case Code (Imperial)=0402, Case Code (Metric)=1005, Manufacturer=Samsung, Max Operating Temperature=85°C, Min Operating Temperature=-55°C, Tolerance=20%, Voltage Rating=16V, Capacitance=4.7uF, Case/Package=0402, Category="Ceramic Capacitors", ComponentLink1Description=http://www.farnell.com/datasheets/2710653.pdf?src-supplier=Farnell, ComponentLink1URL=http://www.farnell.com/datasheets/2710653.pdf?src-supplier=Farnell, ComponentLink2Description=http://www.samsungsem.com/kr/support/product-search/mlcc/CL05A475MO5NUNC.jsp?src-supplier=Digikey, ComponentLink2URL=http://www.samsungsem.com/kr/support/product-search/mlcc/CL05A475MO5NUNC.jsp?src-supplier=Digikey, ComponentLink3Description=http://www.farnell.com/datasheets/2710653.pdf?src-supplier=Element14, ComponentLink3URL=http://www.farnell.com/datasheets/2710653.pdf?src-supplier=Element14, ComponentLink4Description=https://datasheet.octopart.com/CL05A475MO5NUNC-Samsung-Electro-Mechanics-datasheet-123102911.pdf?src-supplier=Future+Electronics, ComponentLink4URL=https://datasheet.octopart.com/CL05A475MO5NUNC-Samsung-Electro-Mechanics-datasheet-123102911.pdf?src-supplier=Future+Electronics, ComponentLink5Description=http://www.farnell.com/datasheets/2710653.pdf?src-supplier=Newark, ComponentLink5URL=http://www.farnell.com/datasheets/2710653.pdf?src-supplier=Newark, Height=550um, Length=0.039inch, Manufacturer Part Number=CL05A475MO5NUNC, Material=4241ConductorMaterial, Mount="Surface Mount", Packaging="Cut Tape", Pricing 1="10000=0.09712 (USD)", RoHS=Yes, RoHS Compliant=Yes, Series=CL, Stock 1=50000, Supplier 1=Avnet, Supplier Part Number 1=CL05A475MO5NUNC, Thickness=0.022inch, Voltage Rating (DC)=16V, Width=0.02inch
D1: "40V Independent Type 1A 600mV SOD-882 Schottky Diodes ROHS", LCSC Part Number=C2912031, Manufacturer=LRC, Package=SOD-882, ComponentLink1Description=LCSC, ComponentLink1URL=https://www.lcsc.com/product-detail/Schottky-Barrier-Diodes-SBD_LRC-LMBR4010BST5G_C2912031.html, Item Type=Diode, Manufacturer Part Number=LMBR4010BST5G
J1: "Pogo Pad 2.5mm 6 Pin"
J2: "CONN FPC/FFC 24POS .5MM", LCSC Part Number=C324726, Manufacturer=Hirose, Supplier Part Number 1=FH34SRJ-24S-0.5SH(50)-ND, Category="FFC / FPC", ComponentLink1Description=https://www.hirose.com/product/download/?distributor=digikey&amp;type=specSheet&amp;lang=en&amp;num=FH34SRJ-24S-0.5SH(50)&src-supplier=Digi-Key, ComponentLink1URL=https://www.hirose.com/product/download/?distributor=digikey&amp;type=specSheet&amp;lang=en&amp;num=FH34SRJ-24S-0.5SH(50)&src-supplier=Digi-Key, Manufacturer Part Number=FH34SRJ-24S-0.5SH(50), Pricing 1="5000=0.53562 (USD)", RoHS=Yes, Stock 1=5000, Supplier 1=Digi-Key
L1: library part LQP03TG2N2B02D, "FIXED IND 2.2NH 450MA 250MOHM SM", Case/Package=0201, Current Rating=450mA, DC Resistance (DCR)=250mR, LCSC Part Number=C341782, Manufacturer=Murata, Max Operating Temperature=125°C, Min Operating Temperature=-55°C, Package Quantity=15000, Self Resonant Frequency=6GHz, Test Frequency=500MHz, ComponentLink1Description=https://datasheet.ciiva.com/29691/jelf243c-0016-29691343.pdf?src-supplier=Digikey, ComponentLink1URL=https://datasheet.ciiva.com/29691/jelf243c-0016-29691343.pdf?src-supplier=Digikey, DC Current=450mA, Depth=0.33mm, Height=0.3mm, Height - Seated (Max)=0.013inch, Item Type=Inductors, Length=0.024inch, Manufacturer Part Number=LQP03TG2N2B02D, Max DC Current=450mA, Military Standard=Not, Mounting Technology="Surface Mount", Packaging="Tape and Reel", Pricing="1=0.1, 10=0.021, 50=0.021, 100=0.015, 1000=0.013, 10000=0.01 (USD)", RoHS=Yes, RoHS Compliant=Yes, Series=LQP03TG_02, Shielding=Unshielded, Stock=35433, Supplier=Mouser, Technology="THIN FILM", Width=0.012inch
L2: library part LQP03HQ1N6B02D, "FIXED IND 1.6NH 1A 50 MOHM SMD", Case Code (Imperial)=0201, Case Code (Metric)=0603, Current Rating=1A, DC Resistance (DCR)=50mR, LCSC Part Number=C237384, Manufacturer=Murata, Max Operating Temperature=125°C, Min Operating Temperature=-55°C, Self Resonant Frequency=10GHz, Supplier Part Number=490-13883-1-ND, Test Frequency=500MHz, Case/Package=0201, Category="Fixed Inductors", ComponentLink1Description=http://search.murata.co.jp/Ceramy/image/img/P02/JELF243C-0021.pdf?src-supplier=Digi-Key, ComponentLink1URL=http://search.murata.co.jp/Ceramy/image/img/P02/JELF243C-0021.pdf?src-supplier=Digi-Key, Core Material=Non-Magnetic, Item Type=Inductor, Manufacturer Part Number=LQP03HQ1N6B02D, Mounting Technology="Surface Mount", Packaging="Cut Tape", Pricing="1=0.16, 10=0.145, 25=0.1236, 50=0.109, 100=0.1, 250=0.09088, 500=0.08544, 1000=0.06545, 2500=0.06181 (USD)", RoHS=Yes, RoHS Compliant=Yes, Series=LQP03, Shielding=Unshielded, Stock=27606, Supplier=Digi-Key
L4: library part SLO252012F4R7MTT, "1.55A 4.7uH ±20% SMD Power Inductors ROHS", LCSC Part Number=C275675, Manufacturer="Sunltech Tech", Package=SMD, ComponentLink1Description=LCSC, ComponentLink1URL=https://www.lcsc.com/product-detail/Power-Inductors_Sunltech-Tech-SLO252012F4R7MTT_C275675.html, Item Type=Inductor, Manufacturer Part Number=SLO252012F4R7MTT
Q4: "MOSFET N-CH 20V 1A DFN1006-3", Drain to Source Resistance=340mR, LCSC Part Number=C570828, Manufacturer=Rohm, ComponentLink1Description=http://www.mouser.com/ds/2/348/rv2c010un-e-1139137.pdf?src-supplier=Mouser, ComponentLink1URL=http://www.mouser.com/ds/2/348/rv2c010un-e-1139137.pdf?src-supplier=Mouser, ComponentLink2Description=http://www.farnell.com/datasheets/1945594.pdf?src-supplier=Farnell, ComponentLink2URL=http://www.farnell.com/datasheets/1945594.pdf?src-supplier=Farnell, ComponentLink3Description=https://www.rohm.com/datasheet/RV2C010UN/rv2c010un-e?src-supplier=Digikey, ComponentLink3URL=https://www.rohm.com/datasheet/RV2C010UN/rv2c010un-e?src-supplier=Digikey, ComponentLink4Description=http://rohmfs.rohm.com/en/techdata_basic/transistor/taping/VML1006_T2L_taping.pdf?src-supplier=Digikey, ComponentLink4URL=http://rohmfs.rohm.com/en/techdata_basic/transistor/taping/VML1006_T2L_taping.pdf?src-supplier=Digikey, ComponentLink5Description=http://rohmfs.rohm.com/en/products/databook/datasheet/discrete/transistor/mosfet/rv2c010unt2l.pdf?src-supplier=Avnet, ComponentLink5URL=http://rohmfs.rohm.com/en/products/databook/datasheet/discrete/transistor/mosfet/rv2c010unt2l.pdf?src-supplier=Avnet, ComponentLink6Description=https://datasheet.octopart.com/RV2C010UNT2L-Rohm-datasheet-57364635.pdf?src-supplier=Element14, ComponentLink6URL=https://datasheet.octopart.com/RV2C010UNT2L-Rohm-datasheet-57364635.pdf?src-supplier=Element14, Item Type=MOSFETs, Manufacturer Part Number=RV2C010UNT2L, Pricing="1=0.42, 10=0.261, 50=0.261, 100=0.123, 1000=0.086, 10000=0.073 (USD)", RoHS=Yes, Stock=16470, Supplier=Mouser
R1: library part RC0201FR-074K7L, "RES 4.7K OHM 1% 1/20W 0201", LCSC Part Number=C138135, Manufacturer=Yageo, Supplier Part Number=7537285, Category="Chip SMD Resistors", ComponentLink1Description=https://datasheet.ciiva.com/2493/pyu-r-int-thick-7-2493811.pdf?src-supplier=Digi-Key, ComponentLink1URL=https://datasheet.ciiva.com/2493/pyu-r-int-thick-7-2493811.pdf?src-supplier=Digi-Key, ComponentLink2Description=https://datasheet.ciiva.com/2493/pyu-r-int-thick-7-2493812.pdf?src-supplier=Digi-Key, ComponentLink2URL=https://datasheet.ciiva.com/2493/pyu-r-int-thick-7-2493812.pdf?src-supplier=Digi-Key, ComponentLink3Description=https://datasheet.ciiva.com/2493/pyu-r-int-thick-7-2493813.pdf?src-supplier=Digi-Key, ComponentLink3URL=https://datasheet.ciiva.com/2493/pyu-r-int-thick-7-2493813.pdf?src-supplier=Digi-Key, ComponentLink4Description=https://datasheet.ciiva.com/8892/pyu-rc0201-51-rohs-l-8-8892942.pdf?src-supplier=Avnet, ComponentLink4URL=https://datasheet.ciiva.com/8892/pyu-rc0201-51-rohs-l-8-8892942.pdf?src-supplier=Avnet, ComponentLink5Description=https://datasheet.ciiva.com/7672/1563626-7672233.pdf?src-supplier=Element14, ComponentLink5URL=https://datasheet.ciiva.com/7672/1563626-7672233.pdf?src-supplier=Element14, Item Type=Resistor, Manufacturer Part Number=RC0201FR-074K7L, Pricing="10000=0.0014, 50000=0.0013, 250000=0.0013, 750000=0.0012, 2000000=0.0011 (USD)", RoHS=Yes, Stock=1610000, Supplier="Future Electronics"
R2 R3 R5 R9 R12 R13 R20: library part RC0201FR-0710KL, "RES SMD 10K OHM 1% 1/20W 0201", LCSC Part Number=C106225, Manufacturer=Yageo, Package=0201, ComponentLink7Description=LCSC, ComponentLink7URL=https://www.lcsc.com/product-detail/Chip-Resistor-Surface-Mount_YAGEO-RC0201FR-0710KL_C106225.html, Item Type=Resistor, Manufacturer Part Number=RC0201FR-0710KL
R4 R8: library part RC0201JR-070RL, "RES SMD 0 OHM JUMPER 1/20W 0201", Case Code (Imperial)=0201, Case Code (Metric)=0603, LCSC Part Number=C106228, Manufacturer=Yageo, Max Operating Temperature=125°C, Max Power Dissipation=50mW, Min Operating Temperature=-55°C, Package Quantity=10000, Resistance Tolerance=5%, Resistor Type="Thick Film", Supplier Part Number 1=311-0.0NCT-ND, Voltage Rating=25V, Case/Package=0201, Category="Chip SMD Resistors", ComponentLink1Description=https://datasheet.ciiva.com/7672/1563626-7672247.pdf?src-supplier=Element14, ComponentLink1URL=https://datasheet.ciiva.com/7672/1563626-7672247.pdf?src-supplier=Element14, ComponentLink2Description=https://datasheet.ciiva.com/7660/1421516-7660808.pdf?src-supplier=Element14, ComponentLink2URL=https://datasheet.ciiva.com/7660/1421516-7660808.pdf?src-supplier=Element14, ComponentLink3Description=https://datasheet.ciiva.com/7672/1563626-7672248.pdf?src-supplier=Element14, ComponentLink3URL=https://datasheet.ciiva.com/7672/1563626-7672248.pdf?src-supplier=Element14, ComponentLink4Description=https://datasheet.ciiva.com/16855/pyu-rc0201-51-rohs-l-8-16855994.pdf?src-supplier=Avnet+Europe, ComponentLink4URL=https://datasheet.ciiva.com/16855/pyu-rc0201-51-rohs-l-8-16855994.pdf?src-supplier=Avnet+Europe, ComponentLink5Description=https://datasheet.ciiva.com/28419/pyu-rc0201-51-rohs-l-8-28419660.pdf?src-supplier=Avnet+Europe, ComponentLink5URL=https://datasheet.ciiva.com/28419/pyu-rc0201-51-rohs-l-8-28419660.pdf?src-supplier=Avnet+Europe, ComponentLink6Description=https://datasheet.ciiva.com/46391/1421516-46391340.pdf?src-supplier=Element14, ComponentLink6URL=https://datasheet.ciiva.com/46391/1421516-46391340.pdf?src-supplier=Element14, ComponentLink7Description=https://datasheet.ciiva.com/8896/pyu-rc0201-51-rohs-l-8-8896143.pdf?src-supplier=Avnet, ComponentLink7URL=https://datasheet.ciiva.com/8896/pyu-rc0201-51-rohs-l-8-8896143.pdf?src-supplier=Avnet, Construction=Rectangular, Contact Plating=Tin,Matte, Depth=0.3mm, Features="Moisture Resistant", Height=0.01inch, Lead Free="Lead Free", Length=0.6mm, Manufacturer Part Number=RC0201JR-070RL, Military Standard=Not, Number of Terminations=2, Packaging="Tape and Reel", Power Rating=50mW, Pricing 1="1=0.10000, 10=0.03600, 25=0.02640, 50=0.02000, 100=0.01480, 250=0.01128, 500=0.00904, 1000=0.00665, 5000=0.00477 (USD)", Radiation Hardening=No, REACH SVHC=Unknown, Resistance=0R, RoHS=Yes, RoHS Compliant=Yes, Series=RC, Size Code=0201, Stock 1=11079, Supplier 1=Digi-Key, Termination=SMD/SMT, Tolerance=5%, Voltage Rating (DC)=25V, Weight=6E-06oz, Width=0.012inch
R6: library part RC0201FR-07100RL, "RES 100 OHM Thick Film 0201 1% 1/20W ±200ppm/°C Molded SMD SMD Paper T/R", Case Code (Metric)=0603, Case/Package=0201, LCSC Part Number=C77623, Manufacturer=Yageo, Max Operating Temperature=125°C, Max Power Dissipation=50mW, Min Operating Temperature=-55°C, Package Quantity=1, Resistance Tolerance=1%, Resistor Type="Thick Film", Supplier Part Number=311-100MCT-ND, Temperature Coefficient=200ppm/°C, Voltage Rating=25V, Category="Chip SMD Resistors", ComponentLink1Description=https://datasheet.ciiva.com/2560/pyu-r-int-thick-7-2560866.pdf?src-supplier=Digi-Key, ComponentLink1URL=https://datasheet.ciiva.com/2560/pyu-r-int-thick-7-2560866.pdf?src-supplier=Digi-Key, ComponentLink2Description=https://datasheet.ciiva.com/2560/pyu-r-int-thick-7-2560867.pdf?src-supplier=Digi-Key, ComponentLink2URL=https://datasheet.ciiva.com/2560/pyu-r-int-thick-7-2560867.pdf?src-supplier=Digi-Key, ComponentLink3Description=https://datasheet.ciiva.com/2560/pyu-r-int-thick-7-2560865.pdf?src-supplier=Digi-Key, ComponentLink3URL=https://datasheet.ciiva.com/2560/pyu-r-int-thick-7-2560865.pdf?src-supplier=Digi-Key, ComponentLink4Description=https://datasheet.ciiva.com/8887/pyu-rc0201-51-rohs-l-8-8887865.pdf?src-supplier=Avnet, ComponentLink4URL=https://datasheet.ciiva.com/8887/pyu-rc0201-51-rohs-l-8-8887865.pdf?src-supplier=Avnet, ComponentLink5Description=LCSC, ComponentLink5URL=https://www.lcsc.com/product-detail/Chip-Resistor-Surface-Mount_YAGEO-RC0201FR-07100RL_C77623.html, Contact Plating=Tin,Matte, Features="Moisture Resistant", Height=0.01inch, Item Type=Resistor, Lead Free="Lead Free", Length=0.024inch, Manufacturer Part Number=RC0201FR-07100RL, Number of Terminations=2, Package=0201, Packaging="Cut Tape", Power Rating=50mW, Pricing="1=0.1, 10=0.027, 50=0.0172, 100=0.0143, 500=0.00988, 1000=0.00854, 5000=0.00629 (USD)", Reach SVHC Compliant=Unknown, RoHS=Yes, RoHS Compliant=Yes, Series=RC, Stock=193246, Supplier=Digi-Key, Termination=SMD/SMT, Tolerance=1%, Width=0.012inch
R14 R15 R16: library part RC0603JR-070RL, "RES 0 OHM JUMPER 1/10W 0603", Case Code (Imperial)=0603, Case Code (Metric)=1608, LCSC Part Number=C95177, Manufacturer=Yageo, Max Operating Temperature=155°C, Max Power Dissipation=100mW, Min Operating Temperature=-55°C, Package Quantity=5000, Resistance=0mR, Resistance Tolerance=5%, Resistor Type="Thick Film", Supplier Part Number 1=311-0.0GRCT-ND, Temperature Coefficient=200ppm/°C, Tolerance=1%, Voltage Rating=50V, Case/Package=0603, Category="Chip SMD Resistors", Construction=Rectangular, Contact Plating=Tin,Matte, Depth=0.8mm, Features="Moisture Resistant", Height=0.45mm, Item Type=Resistor, Lead Free="Lead Free", Length=1.6mm, Manufacturer Part Number=RC0603JR-070RL, Military Standard=Not, Number of Pins=2, Number of Terminations=2, Packaging="Tape and Reel", Power Rating=100mW, Pricing 1="1=0.10000, 10=0.01700, 25=0.01240, 50=0.00960, 100=0.00700, 250=0.00536, 500=0.00430, 1000=0.00316 (USD)", Radiation Hardening=No, Reach SVHC Compliant="No SVHC", RoHS=Yes, RoHS Compliant=Yes, Series=RC, Size Code=0603, Stock 1=18081776, Supplier 1=Digi-Key, Technology="THICK FILM", Termination=SMD/SMT, Voltage Rating (DC)=50V, Width=0.8mm
R19: library part RC0402FR-0710KL, "RES 10K OHM 1% 1/16W 0402", Case Code (Imperial)=0402, Case Code (Metric)=1005, LCSC Part Number=C60490, Manufacturer=Yageo, Max Operating Temperature=155°C, Max Power Dissipation=63mW, Min Operating Temperature=-55°C, Power Rating=62.5mW, Resistance=10kR, Resistance Tolerance=1%, Resistor Type="Thick Film", Supplier Part Number 1=603-RC0402FR-0710KL, Temperature Coefficient=100ppm/°C, Voltage Rating=50V, Case/Package=0402, Category="Chip SMD Resistors", ComponentLink1Description=https://datasheet.ciiva.com/7660/38568-7660787.pdf?src-supplier=Element14, ComponentLink1URL=https://datasheet.ciiva.com/7660/38568-7660787.pdf?src-supplier=Element14, ComponentLink2Description=https://datasheet.ciiva.com/7849/1686128-7849814.pdf?src-supplier=Element14, ComponentLink2URL=https://datasheet.ciiva.com/7849/1686128-7849814.pdf?src-supplier=Element14, ComponentLink3Description=https://datasheet.ciiva.com/7983/1018594-7983486.pdf?src-supplier=Element14, ComponentLink3URL=https://datasheet.ciiva.com/7983/1018594-7983486.pdf?src-supplier=Element14, ComponentLink4Description=https://datasheet.ciiva.com/22747/1018594-22747512.pdf?src-supplier=Element14, ComponentLink4URL=https://datasheet.ciiva.com/22747/1018594-22747512.pdf?src-supplier=Element14, ComponentLink5Description=https://datasheet.ciiva.com/12667/pyu-rc0402-51-rohs-l-6-r-12667067.pdf?src-supplier=Mouser, ComponentLink5URL=https://datasheet.ciiva.com/12667/pyu-rc0402-51-rohs-l-6-r-12667067.pdf?src-supplier=Mouser, ComponentLink6Description=https://datasheet.ciiva.com/7849/1784430-7849813.pdf?src-supplier=Element14, ComponentLink6URL=https://datasheet.ciiva.com/7849/1784430-7849813.pdf?src-supplier=Element14, ComponentLink7Description=https://datasheet.ciiva.com/7849/1784430-7849815.pdf?src-supplier=Element14, ComponentLink7URL=https://datasheet.ciiva.com/7849/1784430-7849815.pdf?src-supplier=Element14, Construction=Rectangular, Depth=0.5mm, Features="Moisture Resistant", Height=0.32mm, Item Type=Resistor, Lead Free="Lead Free", Lead Pitch=0.2mm, Length=1mm, Manufacturer Part Number=RC0402FR-0710KL, Military Standard=Not, Number of Pins=2, Number of Terminations=2, Packaging="Tape and Reel", Pricing 1="1=0.10000, 10=0.01400, 50=0.01400, 100=0.00500, 1000=0.00300, 10000=0.00200 (USD)", REACH SVHC="No SVHC", RoHS=Yes, RoHS Compliant=Yes, Series=RC, Stock 1=18648329, Supplier 1=Mouser, Termination=SMD/SMT, Tolerance=1%, Voltage Rating (DC)=50V, Width=0.5mm, Working Voltage=50V
RT1: library part NCP15XH103F03RC, "THERMISTOR NTC 10KOHM 3380K 0402", Case Code (Imperial)=0402, Case Code (Metric)=1005, Current Rating=310uA, LCSC Part Number=C77131, Manufacturer=Murata, Max Current Rating=100uA, Max Operating Temperature=125°C, Max Power Dissipation=100mW, Min Operating Temperature=-40°C, Package Quantity=1, Resistance Tolerance=1%, Voltage Rating=5V, Case/Package=0402, ComponentLink1Description=https://datasheet.ciiva.com/2848/r44e-2848224.pdf?src-supplier=Digikey, ComponentLink1URL=https://datasheet.ciiva.com/2848/r44e-2848224.pdf?src-supplier=Digikey, ComponentLink2Description=https://datasheet.ciiva.com/11822/0900766b807f1e39-11822004.pdf?src-supplier=Rs, ComponentLink2URL=https://datasheet.ciiva.com/11822/0900766b807f1e39-11822004.pdf?src-supplier=Rs, ComponentLink3Description=https://datasheet.ciiva.com/2848/r44e-2848223.pdf?src-supplier=Digikey, ComponentLink3URL=https://datasheet.ciiva.com/2848/r44e-2848223.pdf?src-supplier=Digikey, ComponentLink4Description=https://datasheet.ciiva.com/2848/r44e-2848225.pdf?src-supplier=Digikey, ComponentLink4URL=https://datasheet.ciiva.com/2848/r44e-2848225.pdf?src-supplier=Digikey, ComponentLink5Description=https://datasheet.ciiva.com/3280/l0770e-3280495.pdf?src-supplier=Avnet, ComponentLink5URL=https://datasheet.ciiva.com/3280/l0770e-3280495.pdf?src-supplier=Avnet, ComponentLink6Description=https://datasheet.ciiva.com/16208/ncp15wb473j03rc-16208150.pdf?src-supplier=Future+Electronics, ComponentLink6URL=https://datasheet.ciiva.com/16208/ncp15wb473j03rc-16208150.pdf?src-supplier=Future+Electronics, Depth=0.5mm, Height=0.5mm, Item Type=Thermistors, Length=1mm, Manufacturer Part Number=NCP15XH103F03RC, Mounting Technology="Surface Mount", Packaging="Tape and Reel", Pins=2, Power Rating=100mW, Pricing="1=0.1, 10=0.09, 50=0.078, 100=0.071, 1000=0.061, 10000=0.05 (USD)", Radiation Hardening=No, Reach SVHC Compliant=No, RoHS=Yes, RoHS Compliant=Yes, Series=NCP, Stock=127865, Supplier=Mouser, Termination=SMD/SMT, Tolerance=1%
SW1: "SWITCH TACTILE SPST-NO 0.05A 12V", LCSC Part Number=C358616, Manufacturer="Alps Electric", Item Type="Tactile Switches", Manufacturer Part Number=SKTAAAE010, Pricing="1=0.4, 10=0.348, 25=0.3256, 100=0.2911, 250=0.26972, 500=0.25456, 1000=0.24043, 2500=0.22353, 5000=0.21213 (USD)", RoHS=Yes, RoHS Compliant=Yes, Stock=54831, Supplier=Digikey